# Altium PCB RF_v2.PcbDoc (part 4 of 4)
Units mm, origin at the board's own origin, x right, y up, seen from the top; angles counter-clockwise.
Board outline 203.1 x 72.1 mm, 2 copper layers (Top Layer, Bottom Layer), stack 1.535 mm thick; 384 components, 237 nets, 1087 pads, 1621 vias.
Unrouted connection lines stored in the file: 4.
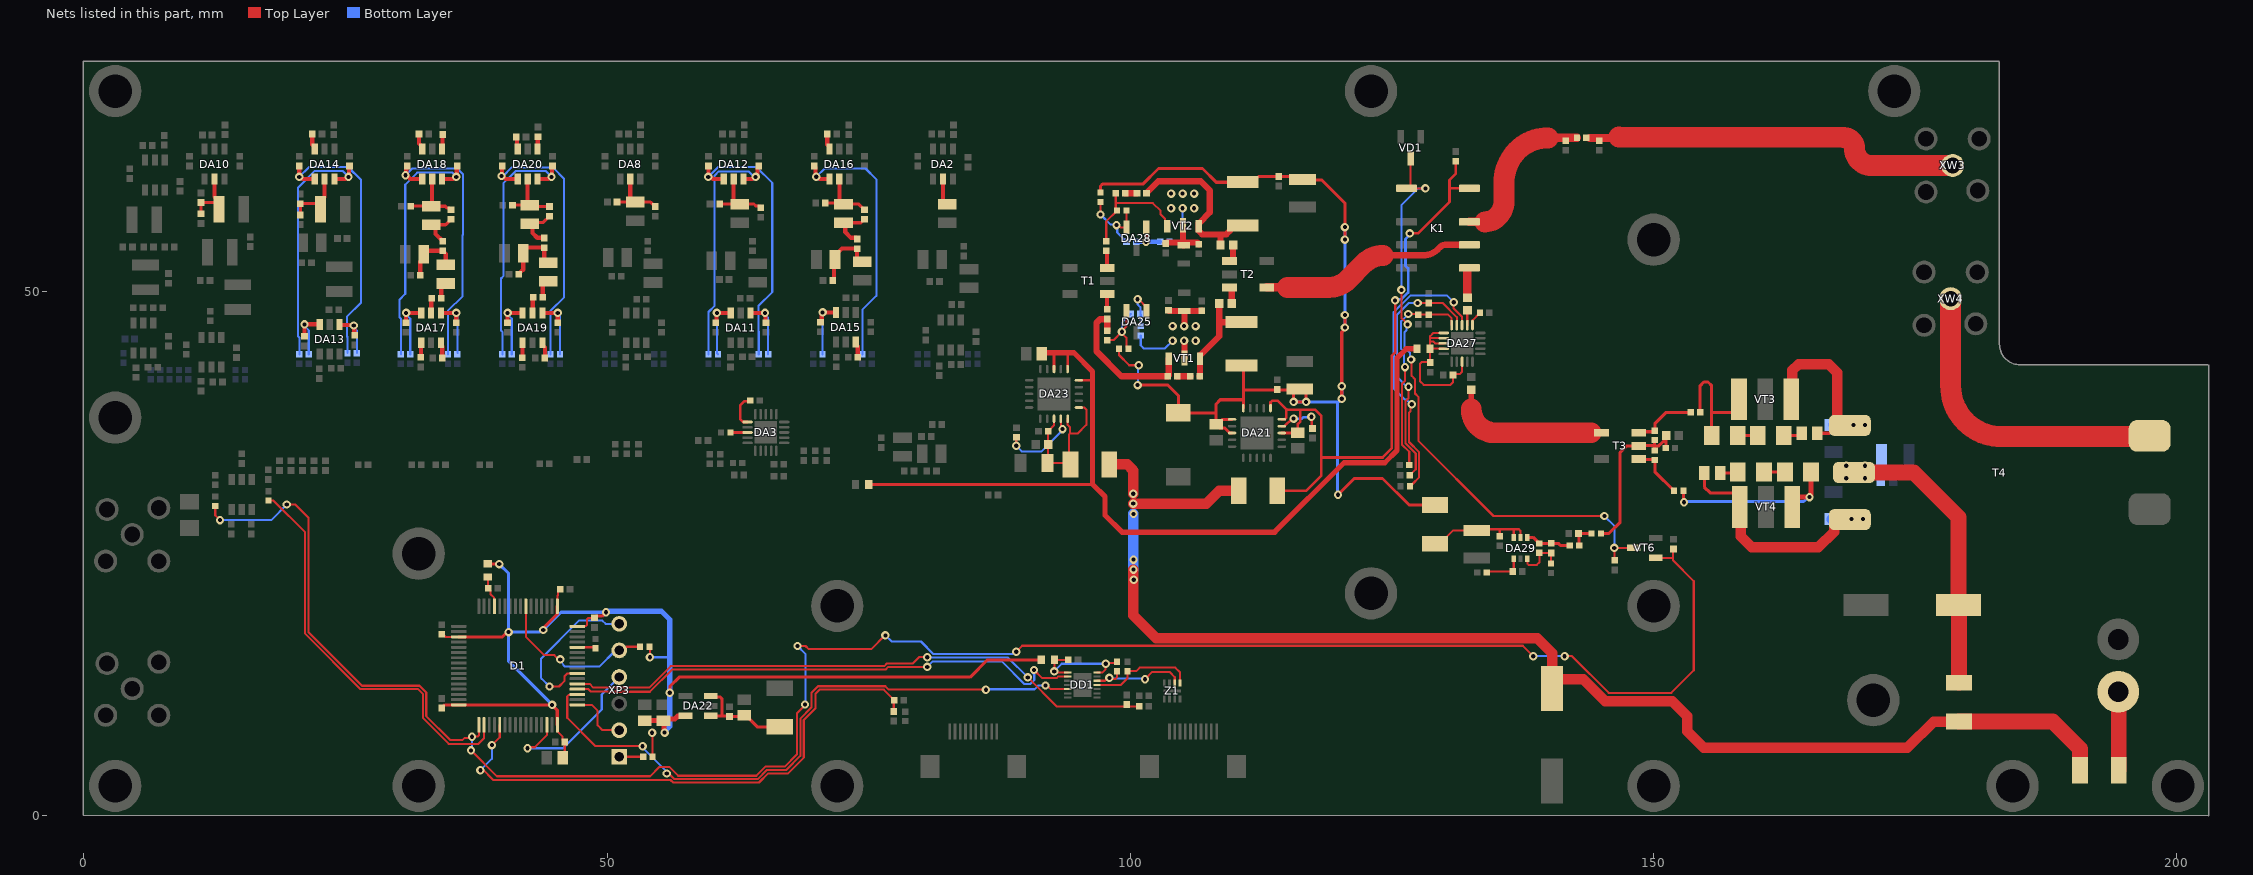
[diagram p3: the nets of this part, all layers, seen from the top]

## Via types
v1: diameter 0.8, hole 0.4, Top Layer to Bottom Layer, tented both sides, 1579 vias
v2: diameter 0.8, hole 0.4, Top Layer to Bottom Layer, 42 vias

## Nets (pads, with @x,y where several pads share a name; then routed paths per layer and width w, separated by ;. In a path a pad name is that pad's centre, name@x,y a point inside that pad or via, vN(x,y) a via of type N, cw(c..) or ccw(c..) an arc to the next point about the centre after c; other vN are vias at no path point) (continued)
NetC81_2: C81.2 DA14.3 | length 1.5
  Top Layer w0.4: C81.2@21.84,65.1 21.84,64.098 22.061,63.877 DA14.3@22.061,63.652
NetC82_1: C82.1 DA11.4 R31.1 | length 6.4
  Top Layer w0.4: DA11.4@63.72,47.999 v1@65.099,47.999 ; v1(65.1,48) 65.15,47.95 65.15,47.11 C82.1@65.2,47.06
  Bottom Layer w0.2: v1(65.1,48) 65.1,47.838 65.4,47.538 R31.1@65.4,44.05
NetC83_1: C83.1 DA11.6 R41.1 | length 6.3
  Top Layer w0.4: C83.1@60.4,47.06 60.45,47.11 60.45,47.95 v1(60.5,48) DA11.6@61.819,47.998
  Bottom Layer w0.2: v1(60.5,48) 60.5,44.15 R41.1@60.6,44.05
NetC84_1: C84.1 DA12.6 R42.2 | length 24
  Top Layer w0.4: DA12.6@63.05,60.802 63.893,60.802 64.092,61 v1(64.2,61) 64.2,61.108 64.38,61.288 64.38,61.92 C84.1@64.5,62.04
  Bottom Layer w0.2: R42.2@59.7,44.05 59.7,48.084 60.289,48.673 60.289,61.133 60.674,61.518 63.522,61.518 64.04,61 v1(64.2,61)
NetC85_1: C85.1 DA12.4 R70.2 | length 26.6
  Top Layer w0.4: v1(59.664,61) 59.682,61.018 59.682,62.022 C85.1@59.7,62.04 ; v1@59.748,61.048 v1@59.796,61 ; v1@59.815,61.019 59.886,61.019 60.103,60.802 DA12.4@61.15,60.802
  Bottom Layer w0.2: v1(59.664,61) 59.697,61 60.636,61.939 64.265,61.939 65.785,60.419 65.785,49.985 64.475,48.675 64.475,46.267 64.5,46.242 R70.2@64.5,44.05
NetC87_1: C87.1 DA13.4 R43.1 | length 5.2
  Top Layer w0.4: DA13.4@24.449,46.915 24.507,46.858 25.742,46.858 v1(25.8,46.8) 25.85,46.75 25.85,45.91 C87.1@25.9,45.86
  Bottom Layer w0.2: v1(25.8,46.8) 25.8,46.638 26.1,46.338 R43.1@26.1,44.15
NetC88_1: C88.1 DA13.6 R72.1 | length 5.6
  Top Layer w0.4: C88.1@21.1,45.76 v1(21.1,46.9) 21.108,46.908 22.541,46.908 DA13.6@22.549,46.915
  Bottom Layer w0.2: v1(21.1,46.9) 21.1,46.738 21.5,46.338 R72.1@21.5,44.05
NetC89_1: C89.1 DA15.3 | length 1.5
  Top Layer w0.4: DA15.3@73.769,45.198 73.769,44.973 73.96,44.782 C89.1@73.96,43.75
NetC90_1: C90.1 C161.2 L20.2 L22.1 | length 6.4
  Top Layer w0.4: C161.2@71.56,51.1 71.675,51.215 71.675,52.985 L22.1@71.79,53.1 71.79,53.48 72.45,54.14 C90.1@73.9,54.14 73.9,53.2 74.21,52.89 L20.2@74.4,52.89
NetC90_2: C90.2 C202.1 L21.1 | length 4.5
  Top Layer w0.3: L21.1@72.6,56.61 74.27,56.61 C202.1@74.6,56.94
  Top Layer w0.4: L21.1@72.6,56.61 72.766,56.444 72.766,55.734 73.326,55.174 73.786,55.174 C90.2@73.9,55.06
NetC91_2: C91.2 C97.2 DA22.1 DA22.3 L30.2 | length 10
  Top Layer w0.3: DA22.1@59.9,9.5 59.93,9.47 60.9,9.47 61.032,9.47 ; DA22.3@59.9,11.4 59.988,11.312 60.798,11.312 60.974,11.136 60.974,9.528 61.032,9.47 ; L30.2@66.5,8.45 64.35,8.45 63.25,9.55 C91.2@63.1,9.55 62.99,9.44 C97.2@61.7,9.44 61.67,9.47 61.032,9.47
NetC98_1: C98.1 C146.1 T4.3 VT3.3 | length 17.8
  Top Layer w0.3: C146.1@165.65,36.5 166.811,36.5 167.561,37.25 T4.3@167.567,37.25
  Top Layer w1: VT3.3@163.155,39.751 163.263,39.859 163.263,42.514 163.849,43.1 166.731,43.1 167.567,42.263 167.567,37.75 T4.3@167.814,37.503
  Bottom Layer w1: C98.1@167.2,37.3 v1(169.1,37.3) v1(170.2,37.3)
NetC100_2: C100.2 DA21.14 | length 4.4
  Top Layer w0.25: DA21.14@114.475,37.175 114.75,37.175 115.475,37.9 v1(115.6,37.9) ; v1(117.3,38.083) 117.35,38.033 117.35,37.01 C100.2@117.4,36.96
  Bottom Layer w0.25: v1(115.6,37.9) 116.4,37.9 116.525,38.025 117.242,38.025 v1(117.3,38.083)
NetC101_2: C101.2 C102.2 C103.2 DA23.13 DA23.15 DA23.16 L39.2 | length 15.5
  Top Layer w0.2: DA23.13@92.71,37.884 92.71,37.259 C103.2@92.154,36.703 92.154,33.704 C101.2@92.105,33.655 94.162,33.655 L39.2@94.289,33.528 94.125,33.692 94.125,36.358 94.242,36.475 ; DA23.15@94.01,37.884 94.01,37.299 94.242,37.067 94.242,36.475 ; DA23.16@95.085,38.959 95.616,38.959 95.8,38.775 95.8,37.3 94.975,36.475 94.242,36.475
NetC105_2: C105.2 DA23.14 | length 7.5
  Top Layer w0.2: v1(89.1,35.3) 89.1,36.09 C105.2@89.125,36.115 ; DA23.14@93.36,37.884 93.36,37.227 93.525,37.062 v1(93.525,36.9)
  Bottom Layer w0.2: v1(89.1,35.3) 89.625,34.775 91.525,34.775 93.525,36.775 v1(93.525,36.9)
NetC112_2: C112.2 D1.13 L40.1 | length 3.1
  Top Layer w0.2: L40.1@38.6,22.77 38.64,22.73 C112.2@38.64,21.7 38.86,21.48 38.86,21.14 39.21,20.79 39.21,20.01 D1.13@39.25,19.97
NetC113_2: C113.2 DD1.1 DD1.14 L41.2 R32.2 | length 11.6
  Top Layer w0.2: DD1.1@94.03,13.65 92.825,13.65 v1(92.725,13.75) 92.755,13.78 L41.2@92.755,14.85 94.063,14.85 C113.2@94.076,14.863 ; DD1.14@96.82,13.65 97.35,13.65 97.618,13.918 97.618,14.443 97.711,14.536 98.585,14.536 R32.2@98.719,14.67
  Bottom Layer w0.2: v1(92.725,13.75) 93.45,14.475 v1(97.65,14.475)
NetC114_2: C114.2 D1.37 R36.2 | length 53.2
  Top Layer w0.2: v1@38.02,4.48 39.131,3.369 56.071,3.369 56.315,3.125 64.528,3.125 65.403,4 67.3,4 68.8,5.5 68.8,9.1 69.926,10.226 69.926,11.626 70.3,12 76.45,12 R36.2@77.45,11 77.4,10.95 C114.2@77.4,9.92 ; v1(39,6.7) 39.75,7.45 D1.37@39.75,8.63
  Bottom Layer w0.2: v1(37.9,4.3) 39,5.4 v1(39,6.7)
NetC115_1: C115.1 DA29.1 R26.2 | length 3.8
  Top Layer w0.2: R26.2@134.05,23.2 134.15,23.3 C115.1@136.54,23.3 136.637,23.397 DA29.1@136.637,24.502
NetC116_1: C116.1 DA14.6 R73.2 | length 24.2
  Top Layer w0.4: DA14.6@23.961,60.802 24.993,60.802 25.192,61 v1(25.3,61) 25.35,61.05 25.35,61.99 C116.1@25.4,62.04
  Bottom Layer w0.2: R73.2@20.6,44.05 20.6,45.642 20.475,45.767 20.475,59.975 22.072,61.572 24.728,61.572 v1(25.3,61)
NetC117_1: C117.1 DA14.4 R74.2 | length 26.5
  Top Layer w0.4: C117.1@20.6,62.04 v1(20.6,61) 20.708,61 20.907,60.802 DA14.4@22.061,60.802
  Bottom Layer w0.2: v1(20.6,61) 21.546,61.946 25.254,61.946 26.5,60.7 26.5,49 25.175,47.675 25.175,45.717 25.2,45.692 R74.2@25.2,44.15
NetC118_2: C118.2 DA16.3 | length 1.5
  Top Layer w0.4: C118.2@71.04,65.1 71.04,64.087 71.25,63.877 DA16.3@71.25,63.652
NetC119_1: C119.1 DA17.1 | length 1.4
  Top Layer w0.4: C119.1@32.2,43.76 32.22,43.78 32.22,45.129 DA17.1@32.239,45.148
NetC121_2: C121.2 DA18.1 | length 1.4
  Top Layer w0.4: DA18.1@34.24,63.652 34.27,63.682 34.27,65.01 C121.2@34.3,65.04
NetC124_1: C124.1 R46.1 | length 1.2
  Top Layer w0.6: R46.1@104.475,41.946 C124.1@105.725,41.946
NetC124_2: C124.2 C127.2 L44.2 VT1.3 | length 9.8
  Top Layer w0.6: C124.2@106.645,41.946 106.668,41.97 106.668,43.953 108.493,45.777 108.493,47.117 ; C127.2@108.493,48.895 108.493,47.117 ; L44.2@110.617,47.117 108.493,47.117
NetC126_1: C126.1 R45.2 R46.2 VT1.1 | length 14.5
  Top Layer w0.6: R45.2@97.79,46.297 C126.1@97.79,47.419 97.77,47.399 97.105,47.399 96.774,47.068 96.774,44.323 99.151,41.946 R46.2@103.575,41.946 103.668,42.039 VT1.1@103.668,43.621
NetC126_2: C126.2 T1.3 | length 1.5
  Top Layer w0.4: C126.2@97.782,48.347 T1.3@97.782,49.804
NetC127_1: C127.1 T2.1 | length 1.7
  Top Layer w0.6: T2.1@109.482,50.439 109.613,50.439 109.693,50.359 C127.1@109.693,48.895
NetC128_2: C128.2 C136.2 DA8.5 L11.2 | length 5.5
  Top Layer w0.3: C136.2@50.96,58.6 L11.2@52.221,58.6 ; L11.2@52.7,58.59 54.17,58.59 C128.2@54.6,58.16
  Top Layer w0.4: L11.2@52.221,58.611 DA8.5@52.221,60.802
NetC129_1: C129.1 C130.1 R47.1 R85.2 VT1.2 | length 10.7
  Top Layer w0.6: C129.1@103.644,48.265 103.726,48.183 R47.1@105.168,48.183 ; VT1.2@105.168,43.696 v2@105.168,45.336 ; v2@105.168,46.736 R47.1@105.168,48.183 ; C130.1@106.819,48.217 106.785,48.183 R47.1@105.168,48.183
  Bottom Layer w0.2: R85.2@101,45.85 101,44.9 101.3,44.6 103.303,44.6 v2(104.039,45.336)
  other v2: 105.14,45.336 106.24,45.336 104.039,46.736 105.14,46.736 106.24,46.736
NetC131_1: C131.1 DA27.2 | length 1.4
  Top Layer w0.2: C131.1@132.199,48.252 C131.1@132.207,48.26
  Top Layer w0.25: DA27.2@132.199,46.835 C131.1@132.199,48.252
NetC131_2: C131.2 K1.5 | length 2.8
  Top Layer w0.8: C131.2@132.207,49.46 K1.5@132.207,52.25
NetC132_1: C132.1 T2.3 | length 1.8
  Top Layer w0.6: T2.3@109.482,52.939 109.74,52.939 109.82,53.019 C132.1@109.82,54.483
NetC132_2: C132.2 C143.2 L47.1 VT2.3 | length 17.1
  Top Layer w0.6: C143.2@101.552,59.448 101.564,59.448 101.572,59.456 101.572,59.468 102.683,60.579 106.721,60.579 107.6,59.7 107.6,57.6 106.585,56.585 106.529,56.585 106.529,55.85 106.88,55.499 108.585,55.499 ; C132.2@108.62,54.483 108.62,55.464 108.585,55.499 ; L47.1@110.744,56.35 109.789,56.35 109.519,56.08 109.519,55.85 109.168,55.499 108.585,55.499
NetC133_2: C133.2 C134.2 R48.2 R86.2 VT2.2 | length 9.5
  Top Layer w0.6: C133.2@103.378,54.641 103.46,54.723 105.029,54.723 106.392,54.723 C134.2@106.553,54.562 ; VT2.2@105.029,56.36 105.029,54.475 R48.2@105.1,54.475
  Bottom Layer w0.2: R86.2@103.75,54.8 104.7,54.8 105,55.1 v2(105,58)
  other v2: 103.9,58 106.1,58 103.9,59.4 105,59.4 106.1,59.4
NetC135_2: C135.2 C145.2 DA10.5 L13.2 | length 5.9
  Top Layer w0.3: C135.2@11.2,57.46 C145.2@11.2,58.54 12.56,58.54 12.92,58.18 L13.2@12.92,57.9
  Top Layer w0.4: DA10.5@12.497,60.802 12.509,60.79 12.509,59.091 12.9,58.7 L13.2@12.9,58.28
NetC137_2: C137.2 C138.2 DA27.6 DA27.7 DA27.8 DA27.9 DA27.13 L45.1 | length 16.7
  Top Layer w0.2: DA27.9@129.949,44.585 128.654,44.585 L45.1@128.646,44.577 ; DA27.8@129.949,45.085 129.14,45.085 128.975,45.25 128.646,45.25 ; DA27.7@129.949,45.585 128.706,45.585 128.646,45.525 ; DA27.6@129.949,46.085 128.96,46.085 128.646,45.771 128.646,45.525 ; DA27.13@131.699,43.335 131.699,42.374 131.475,42.15 130.91,42.15 C137.2@130.835,42.075 130.835,41.36 130.6,41.125 128.025,41.125 127.675,41.475 127.675,43.125 127.875,43.325 128.585,43.325 128.646,43.264 L45.1@128.646,44.577 ; L45.1@128.646,44.577 128.646,45.25 ; 128.646,45.25 128.646,45.525
NetC139_1: C139.1 R56.1 R57.1 VT2.1 | length 11.4
  Top Layer w0.2: C139.1@97.7,54.86 97.7,56.748 R56.1@98.737,57.785 98.61,57.912 98.61,58.488 ; R57.1@98.61,59.436 98.61,58.488 ; VT2.1@103.529,56.285 103.329,56.485 103.329,56.971 102.9,57.4 102.9,57.747 102.158,58.488 98.61,58.488
NetC139_2: C139.2 T1.1 | length 1.7
  Top Layer w0.4: C139.2@97.7,53.94 cw(c97.502,53.742) 97.782,53.742 T1.1@97.782,52.304
NetC140_2: C140.2 DA27.4 R53.1 | length 24.2
  Top Layer w0.2: v1(126.576,40.95) 126.576,39.834 126.276,39.534 126.276,35.566 127.275,34.567 127.275,33.05 R53.1@126.7,32.475 ; v1(127.45,48.95) 128.517,48.95 C140.2@128.524,48.943 129.857,48.943 131.199,47.601 DA27.4@131.199,46.835
  Bottom Layer w0.2: v1(126.576,40.95) 126.425,40.95 125.5,41.875 125.5,47.85 126.6,48.95 v1(127.45,48.95)
NetC141_2: C141.2 DA27.5 R54.1 R55.1 | length 20.3
  Top Layer w0.2: v1(126.251,42.825) 126.251,41.509 125.951,41.209 125.951,35.431 126.65,34.732 R54.1@126.65,33.475 ; v1(126.55,47.9) 127.429,47.9 127.498,47.831 C141.2@128.524,47.831 130.368,47.831 130.699,47.5 DA27.5@130.699,46.835
  Bottom Layer w0.2: v1(126.251,42.825) 126.15,42.926 126.15,44.29 125.875,44.565 125.875,47.208 126.55,47.883 v1(126.55,47.9)
NetC142_1: C142.1 DA29.3 R50.2 R58.1 | length 4.9
  Top Layer w0.2: DA29.3@137.937,24.502 137.937,24.042 138.054,23.925 138.85,23.925 139.1,24.175 139.1,25.042 R58.1@139.065,25.077 140.198,25.077 C142.1@140.208,25.067 140.208,24.058 R50.2@140.2,24.05
NetC142_2: C142.2 DA29.4 R58.2 R60.1 | length 4.4
  Top Layer w0.3: DA29.4@137.937,26.552 138.49,26.552 R58.2@139.065,25.977 140.901,25.977 141.097,25.781 R60.1@141.986,25.781
NetC143_1: C143.1 R57.2 | length 1.1
  Top Layer w0.6: R57.2@99.51,59.436 C143.1@100.632,59.436
NetC144_2: C144.2 C151.1 DA29.5 DA29.6 L46.2 | length 10.9
  Top Layer w0.2: L46.2@129.1,25.95 129.6,25.95 130.875,27.225 C144.2@133.1,27.225 133.2,27.325 135.351,27.325 ; C151.1@135.3,26.66 135.3,27.274 135.351,27.325 ; DA29.6@136.637,26.552 136.637,27.32 136.642,27.325 ; DA29.5@137.287,26.552 137.287,27.163 137.125,27.325 135.351,27.325
NetC146_2: C146.2 R62.2 | length 1.8
  Top Layer w0.3: R62.2@162.45,36.3 C146.2@163.95,36.3 ; C146.2@163.95,36.1 C146.2@164.15,36.3
NetC147_1: C147.1 R60.2 R61.1 | length 2.4
  Top Layer w0.3: R60.2@142.886,25.781 142.886,26.865 C147.1@142.827,26.924 R61.1@144.076,26.924
NetC148_1: C148.1 DA17.3 | length 1.7
  Top Layer w0.4: C148.1@34.139,43.821 C148.1@34.26,43.7 34.26,44.802 34.139,44.923 DA17.3@34.139,45.148
NetC152_1: C152.1 T3.5 | length 14.6
  Top Layer w0.5: 132.575,38.825 C152.1@132.575,40.675
  Top Layer w2: 132.575,38.825 132.576,38.748 ccw(c134.859,38.825) 132.732,37.994 132.789,37.86 ccw(c134.859,38.825) 133.193,37.263 133.296,37.159 ccw(c134.859,38.825) 134.659,36.55 144,36.55
NetC153_2: C153.2 R61.2 R63.1 R87.2 R88.1 T3.2 | length 16
  Top Layer w0.3: R61.2@144.976,26.924 145.724,26.924 146.8,28 146.8,34.671 147.429,35.3 T3.2@148.57,35.3 148.596,35.326 150.1,35.326 ; R88.1@150.1,34.85 150.1,35.326 ; R87.2@150.1,35.85 150.1,35.326 ; R63.1@151.15,35.1 151.175,35.125 151.175,35.7 ; C153.2@151.2,36.3 151.175,36.275 151.175,35.7 ; 150.1,35.326 150.126,35.3 150.5,35.3 150.9,35.7 151.175,35.7
NetC154_2: C154.2 C156.1 C157.2 L49.2 T4.2 | length 27.6
  Top Layer w1: C156.1@179.125,20.075 C156.1@179.175,20.025
  Top Layer w1.5: T4.2@169.15,32.75 174.85,32.75 179.125,28.475 C156.1@179.125,20.075 ; L49.2@179.175,12.65 C156.1@179.175,20.025
  other v1: 168.4,32.2 170.2,32.2 168.4,33.4 170.2,33.4
NetC155_1: C155.1 C210.1 T4.1 VT4.3 | length 24.3
  Top Layer w0.3: C155.1@154.85,32.9 C155.1@154.85,32.7 154.85,31.35 155.4,30.8 157.642,30.8 158.242,30.2 VT4.3@158.242,29.464
  Top Layer w1: VT4.3@158.242,29.464 158.31,29.396 158.31,26.66 159.37,25.6 165.754,25.6 167.25,27.096 167.25,27.75 167.75,28.25 T4.1@168.75,28.25
  Bottom Layer w1: C210.1@167,28.3 C210.1@167.2,28.3 v1(168.9,28.3) v1(170,28.3)
NetC155_2: C155.2 R66.2 | length 1.7
  Top Layer w0.3: C155.2@156.35,32.7 R66.2@157.95,32.7 ; R66.2@157.95,32.9 R66.2@158.05,33
NetC158_2: C158.2 D1.53 R68.2 | length 57.2
  Top Layer w0.2: D1.53@47.17,12.55 48.35,12.55 48.7,12.2 54.04,12.2 56.09,14.25 66.268,14.25 76.488,14.25 76.738,14.5 79.2,14.5 79.825,15.125 80.575,15.125 v1(80.6,15.1) ; v1(90.198,13.173) 90.202,13.173 93,10.375 99.453,10.375 C158.2@99.656,10.578 99.831,10.403 R68.2@100.857,10.403
  Bottom Layer w0.2: v1(80.6,15.1) 80.625,15.075 88.296,15.075 v1(90.198,13.173)
NetC159_1: C159.1 DA17.5 | length 1.4
  Top Layer w0.4: DA17.5@33.189,47.998 33.215,48.024 33.215,49.375 C159.1@33.24,49.4
NetC159_2: C159.2 L24.1 | length 1.7
  Top Layer w0.4: C159.2@34.16,49.4 34.16,50.5 34.47,50.81 L24.1@34.6,50.81
NetC160_1: C160.1 C165.2 L24.2 L26.1 | length 5.6
  Top Layer w0.4: C165.2@32.16,51.6 32.16,52.89 32.49,53.22 L26.1@32.49,53.6 32.49,53.63 32.8,53.94 C160.1@34.3,53.94 34.6,53.64 L24.2@34.6,52.59
NetC160_2: C160.2 C203.1 L25.1 | length 4.1
  Top Layer w0.3: L25.1@33.28,56.42 34.58,56.42 C203.1@35.1,56.94
  Top Layer w0.4: L25.1@33.2,56.41 33.316,56.41 33.626,56.1 33.626,55.534 C160.2@34.3,54.86
NetC162_2: C162.2 DA18.3 | length 1.6
  Top Layer w0.4: C162.2@32.04,65.1 32.04,64.177 32.34,63.877 DA18.3@32.34,63.652
NetC163_1: C163.1 DA15.6 R75.1 | length 6.3
  Top Layer w0.4: C163.1@70.4,47.11 70.52,47.23 70.52,47.862 70.6,47.942 v1(70.6,48.05) ; v1@70.601,48.049 DA15.6@71.869,48.048
  Bottom Layer w0.2: R75.1@70.6,44.05 v1(70.6,48.05)
NetC164_1: C164.1 DA16.4 R77.2 | length 26.2
  Top Layer w0.4: C164.1@69.8,62.04 69.92,61.92 69.92,61.188 69.998,61.11 v1(69.998,61.002) ; v1@70,61.002 70.106,61.002 70.307,60.802 DA16.4@71.25,60.802
  Bottom Layer w0.2: v1(69.998,61.002) 70.002,61.002 70.801,61.801 74.699,61.801 75.734,60.766 75.734,49.634 74.4,48.3 R77.2@74.4,44.05
NetC166_1: C166.1 DA17.4 R76.1 | length 6.3
  Top Layer w0.4: DA17.4@34.139,47.998 35.599,47.999 C166.1@35.6,47.06
  Bottom Layer w0.2: v1(35.6,48) 35.6,47.838 35.721,47.716 35.721,44.171 R76.1@35.7,44.15
NetC167_1: C167.1 DA17.6 R78.1 | length 6.5
  Top Layer w0.4: C167.1@30.8,47.06 v1(30.8,48) ; v1@30.801,47.999 DA17.6@32.238,47.999
  Bottom Layer w0.2: v1(30.8,48) 30.8,47.838 31.2,47.438 R78.1@31.2,44.05
NetC168_1: C168.1 DA18.6 R79.2 | length 24.5
  Top Layer w0.4: DA18.6@34.24,60.802 35.293,60.802 35.492,61 v1(35.6,61) 35.65,61.05 35.65,61.99 C168.1@35.7,62.04
  Bottom Layer w0.2: R79.2@30.3,44.05 30.3,47.458 30.175,47.583 30.175,49.267 30.723,49.815 30.723,51.339 30.725,51.341 30.725,60.248 31.78,61.303 31.897,61.42 35.196,61.42 35.6,61.016 v1(35.6,61)
NetC169_1: C169.1 DA18.4 R80.2 | length 26.5
  Top Layer w0.4: v1(30.746,61.154) v1@30.9,61.154 ; C169.1@30.9,62.04 30.823,61.963 30.823,61.231 v1@30.9,61.154 ; DA18.4@32.34,60.802 31.207,60.802 30.9,61.108 v1@30.9,61.154
  Bottom Layer w0.2: v1(30.746,61.154) 31.393,61.8 35.7,61.8 36.225,61.275 36.225,55.442 36.2,55.417 36.2,49.6 34.8,48.2 R80.2@34.8,44.05
NetC170_1: C170.1 DA19.1 | length 1.4
  Top Layer w0.4: C170.1@41.9,43.72 41.917,43.737 41.917,45.131 DA19.1@41.934,45.148
NetC171_2: C171.2 DA20.1 | length 1.2
  Top Layer w0.4: DA20.1@43.365,63.652 43.383,63.669 43.383,64.822 C171.2@43.4,64.84
NetC172_1: C172.1 DA19.3 | length 1.5
  Top Layer w0.4: DA19.3@43.834,45.148 43.834,44.923 44.06,44.698 C172.1@44.06,43.7
NetC173_1: C173.1 DA19.5 | length 1.5
  Top Layer w0.4: DA19.5@42.884,47.998 42.912,48.027 42.912,49.472 C173.1@42.94,49.5
NetC173_2: C173.2 L27.1 | length 1.9
  Top Layer w0.4: C173.2@43.86,49.5 43.86,50.7 44.17,51.01 L27.1@44.4,51.01
NetC174_1: C174.1 C176.2 L27.2 L29.1 | length 6.2
  Top Layer w0.4: C176.2@41.56,51.7 41.99,52.13 41.99,53.88 42.35,54.24 C174.1@44,54.24 44,53.1 44.31,52.79 L27.2@44.4,52.79
NetC174_2: C174.2 C206.1 L28.1 | length 5.4
  Top Layer w0.3: L28.1@42.155,56.355 42.446,56.646 43.906,56.646 C206.1@44.5,57.24
  Top Layer w0.4: L28.1@42.155,56.355 42.721,56.355 42.876,56.2 42.876,55.634 43.331,55.179 43.981,55.179 C174.2@44,55.16
NetC175_2: C175.2 DA20.3 | length 1.2
  Top Layer w0.4: C175.2@41.34,64.8 41.403,64.737 41.403,63.714 DA20.3@41.465,63.652
NetC177_1: C177.1 DA19.4 R81.1 | length 6.4
  Top Layer w0.4: DA19.4@43.835,47.999 45.299,47.999 C177.1@45.3,47.06
  Bottom Layer w0.2: v1(45.3,48) 45.3,47.838 45.5,47.638 R81.1@45.5,44.05
NetC178_1: C178.1 DA19.6 R82.1 | length 6.5
  Top Layer w0.4: C178.1@40.5,47.06 v1(40.5,48) DA19.6@41.934,47.998
  Bottom Layer w0.2: v1(40.5,48) 40.5,47.838 40.9,47.438 R82.1@40.9,44.05
NetC179_1: C179.1 DA20.6 R83.2 | length 24.3
  Top Layer w0.4: DA20.6@43.365,60.802 44.393,60.802 44.592,61 v1(44.7,61) 44.75,61.05 44.75,61.99 C179.1@44.8,62.04
  Bottom Layer w0.2: R83.2@40,44.05 40,46.192 39.875,46.317 39.875,51.291 40.103,51.519 40.103,60.378 41.3,61.575 44.125,61.575 v1(44.7,61)
NetC180_1: C180.1 DA20.4 R84.2 | length 26.7
  Top Layer w0.4: v1(39.921,61.079) v1@40,61.079 ; C180.1@40,62.04 39.96,62 39.96,61.119 v1@40,61.079 ; DA20.4@41.465,60.802 40.307,60.802 40.029,61.079 v1@40,61.079
  Bottom Layer w0.2: v1(39.921,61.079) 40.079,61.079 40.9,61.9 44.8,61.9 45.9,60.8 45.9,49.5 44.6,48.2 R84.2@44.6,44.05
NetC181_2: C181.2 C199.2 DA12.5 L19.2 | length 6
  Top Layer w0.3: C199.2@60.76,58.4 L19.2@62.3,58.4 ; L19.2@62.69,58.4 64.04,58.4 64.21,58.23 64.53,58.23 C181.2@64.7,58.06
  Top Layer w0.4: DA12.5@62.1,60.802 62.1,58.79 L19.2@62.3,58.59
NetC182_1: C182.1 DA25.2 R44.1 R45.1 | length 7.9
  Top Layer w0.2: R45.1@97.79,45.397 98.397,45.397 v1(99.2,46.2) ; DA25.2@99.647,48.203 99.647,46.743 99.2,46.297 v1(99.2,46.2) ; R44.1@99.822,44.577 99.622,44.777 99.622,45.632 99.2,46.054 v1(99.2,46.2)
  Bottom Layer w0.2: v1(99.2,46.2) 99.2,47.06 C182.1@100.04,47.9
NetC182_2: C182.2 DA25.1 R85.1 | length 4.2
  Top Layer w0.2: v1(100.7,49.3) 100.8,49.3 101.546,48.553 DA25.1@101.546,48.203
  Bottom Layer w0.2: v1(100.7,49.3) 100.7,48.8 100.96,48.54 C182.2@100.96,47.9 101,47.86 R85.1@101,46.75
NetC183_1: C183.1 DA28.1 R86.1 | length 3.7
  Top Layer w0.4: v1(101.5,54.8) ccw(c101.418,54.882) 101.534,54.882 DA28.1@101.534,56.168
  Bottom Layer w0.4: C183.1@100.56,54.8 v1(101.5,54.8) R86.1@102.85,54.8
NetC183_2: C183.2 DA28.2 R56.2 R59.2 | length 7.8
  Top Layer w0.2: v1(97.155,57.404) R59.2@97.155,58.605 ; v1(98.679,56.388) 98.841,56.388 99.061,56.168 DA28.2@99.634,56.168 99.634,57.782 R56.2@99.637,57.785
  Bottom Layer w0.2: v1(97.155,57.404) 98.13,56.429 98.638,56.429 v1(98.679,56.388) 98.752,56.315 98.752,55.688 C183.2@99.64,54.8
NetC200_2: C200.2 C201.2 DA14.5 L16.2 | length 6.4
  Top Layer w0.3: C200.2@20.7,57.36 C201.2@20.7,58.44 22.26,58.44 22.62,58.08 L16.2@22.62,57.9
  Top Layer w0.4: L16.2@22.62,57.9 22.62,58.66 23.011,59.051 DA14.5@23.011,60.802
NetC202_2: C202.2 C204.2 DA16.5 L21.2 | length 5.8
  Top Layer w0.3: C204.2@70.86,58.5 L21.2@72.2,58.5 ; L21.2@72.6,58.39 74.07,58.39 C202.2@74.6,57.86
  Top Layer w0.4: DA16.5@72.2,60.802 72.2,58.69 L21.2@72.3,58.59
NetC203_2: C203.2 C205.2 DA18.5 L25.2 | length 6.3
  Top Layer w0.3: C205.2@31.26,58.2 L25.2@32.98,58.2 ; L25.2@33.2,58.19 34.54,58.19 34.7,58.03 34.93,58.03 C203.2@35.1,57.86
  Top Layer w0.4: L25.2@33.135,58.355 33.29,58.51 DA18.5@33.29,60.802
NetC206_2: C206.2 C207.2 DA20.5 L28.2 | length 5.9
  Top Layer w0.3: C207.2@40.96,58.3 L28.2@42.2,58.3 ; L28.2@42.6,58.29 42.73,58.16 C206.2@44.5,58.16
  Top Layer w0.4: L28.2@42.105,58.29 42.415,58.6 DA20.5@42.415,60.802 ; L28.2@42.2,58.29 L28.2@42.305,58.29
NetD1_7: D1.7 R35.1 XP3.5 | length 16
  Top Layer w0.2: D1.7@42.25,19.97 42.25,17.05 44.003,15.297 44.963,15.297 45.367,14.893 v1(45.53,14.893) ; XP3.5@51.167,15.748 51.519,15.748 51.871,16.1 R35.1@53.15,16.1 R35.1@53.202,16.152
  Bottom Layer w0.2: v1(45.53,14.893) 45.866,14.317 45.983,14.2 49.267,14.2 50.815,15.748 XP3.5@51.167,15.748
NetD1_60: D1.60 R38.1 | length 1.8
  Top Layer w0.2: D1.60@47.17,16.05 48.8,16.05 R38.1@48.9,15.95
NetDA2_5: DA2.5 L2.2 | length 3
  Top Layer w0.4: DA2.5@82.1,60.802 82.1,58.5 82.41,58.19 L2.2@82.7,58.19
NetDA3_1: DA3.1 R3.2 | length 3.3
  Top Layer w0.25: DA3.1@63.427,37.576 62.999,37.576 62.725,37.85 62.725,39.15 63.15,39.575 63.634,39.575 R3.2@63.683,39.624
NetDA3_3: DA3.3 R4.1 | length 1.6
  Top Layer w0.25: R4.1@61.789,36.576 DA3.3@63.427,36.576
NetDA27_1: DA27.1 R49.2 | length 1.5
  Top Layer w0.2: DA27.1@132.699,46.835 132.709,46.845 132.709,47.307 R49.2@133.408,48.006
NetDA27_3: DA27.3 R52.1 | length 27.5
  Top Layer w0.2: R52.1@126.725,31.45 126.925,31.65 126.968,31.65 127.6,32.282 127.6,34.701 126.634,35.667 126.634,38.475 126.786,38.627 126.786,39.16 v1(126.901,39.275) ; v1(130.9,49.025) 130.9,48.424 131.699,47.625 DA27.3@131.699,46.835
  Bottom Layer w0.2: v1(126.901,39.275) 126.816,39.275 126.364,39.728 126.222,39.728 125.175,40.775 125.175,48.075 125.962,48.862 125.977,48.862 126.764,49.65 130.275,49.65 v1(130.9,49.025)
NetK1_6: K1.6 T2.5 | length 20.7
  Top Layer w0.6: 124.152,53.5 128,53.5 ccw(c128,55.431) 129.366,54.066 129.6,54.3 cw(c130.083,53.817) 130.083,54.5 K1.6@132.4,54.5
  Top Layer w0.8: T2.5@113.022,50.439 115,50.439
  Top Layer w2: 115,50.439 118.987,50.439 ccw(c118.987,52.979) 120.783,51.183 122.356,52.756 cw(c124.152,50.96) 124.152,53.5
NetK1_7: K1.7 R39.1 R40.1 | length 15.7
  Top Layer w0.8: K1.7@132.4,56.7 133.893,56.7 ; 135.7,60.404 135.7,60.406 ; 139.896,64.732 141.6,64.732 R39.1@142.679,64.732
  Top Layer w2: 133.893,56.7 ccw(c133.893,58.407) 135.1,57.2 ccw(c133.651,58.649) 135.7,58.649 135.7,60.404 ; 135.7,60.406 cw(c140.117,60.416) 136.995,63.541 ; 136.996,63.541 cw(c139.871,60.665) 139.896,64.732
NetL50_1: L50.1 XP1.1 | length 7.5
  Top Layer w1.5: L50.1@194.45,4.3 XP1.1@194.45,11.75
NetR34_2: R34.2 XP3.1 | length 2.3
  Top Layer w0.2: XP3.1@51.167,5.588 53.438,5.588 R34.2@53.45,5.6
NetR39_2: R39.2 R71.1 XW3.1 | length 35.6
  Top Layer w0.8: 143.9,64.71 146.3,64.71
  Top Layer w2: 146.7,64.799 168.185,64.745 cw(c168.185,63.729) 169.201,63.729 ccw(c170.865,63.729) 170.865,62.065 ; 170.875,62.09 XW3.1@178.387,62.09
NetR51_1: R51.1 R87.1 T3.1 | length 6.1
  Top Layer w0.3: T3.1@148.57,36.55 148.67,36.65 150,36.65 R87.1@150.1,36.75 150.125,36.775 150.125,37.425 151.2,38.5 R51.1@153.45,38.5
NetR51_2: R51.2 R64.1 VT3.1 | length 12.4
  Top Layer w0.3: R51.2@154.45,38.5 154.45,41.05 154.8,41.4 155.2,41.4 155.55,41.05 155.55,38.5 ; R64.1@155.55,36.1 R64.1@155.55,36.3 155.55,38.5 ; VT3.1@158.155,39.751 158.155,39.1 157.555,38.5 155.55,38.5
NetR62_1: R62.1 R64.2 | length 1.9
  Top Layer w0.3: R64.2@158.05,36.3 R62.1@159.95,36.3
NetR65_1: R65.1 R66.1 | length 2
  Top Layer w0.3: R66.1@160.55,32.8 R65.1@162.55,32.8
NetR65_2: R65.2 R89.2 VT4.1 | length 18.3
  Top Layer w0.3: R89.2@152.85,31 152.875,30.975 152.875,29.925 v1(152.9,29.9)
  Top Layer w0.5: VT4.1@163.242,29.464 163.242,29.9 163.742,30.4 v1(164.9,30.4) 164.9,30.481 165.05,30.631 R65.2@165.05,33
  Bottom Layer w0.3: v1(152.9,29.9) 152.975,29.975 164.34,29.975 164.765,30.4 v1(164.9,30.4)
NetR88_2: R88.2 R89.1 T3.3 | length 5.3
  Top Layer w0.3: T3.3@148.57,34.05 148.62,34 150.05,34 R88.2@150.1,33.95 150.125,33.925 150.125,32.825 R89.1@151.95,31
NetT4_4: T4.4 XW4.1 | length 30
  Top Layer w2: XW4.1@178.387,49.358 178.387,41.02 ccw(c183.232,41.02) 183.232,36.175 T4.4@197.319,36.175
RELAY_TX: C125.1 K1.1 VD1.3 VT6.3 | length 58.3
  Top Layer w0.2: v1(125.9,50.2) 125.9,49.484 125.925,49.459 125.925,48.467 125.925,47.475 v1(126.5,46.9) ; K1.1@126.4,59.9 126.519,59.9 126.769,60.15 126.769,62.719 VD1.3@126.8,62.75 ; K1.1@126.677,59.9 v1(128.2,59.9) ; v1(126.835,43.543) 126.876,43.501 126.876,41.981 127.201,41.656 127.201,40.299 127.526,39.974 127.526,35.774 134.7,28.6 v1(145.3,28.6) ; C125.1@146.3,24.36 146.25,24.41 v1(146.25,25.55) VT6.3@148.1,25.55
  Bottom Layer w0.2: v1(125.9,50.2) 125.9,58.3 127.5,59.9 v1(128.2,59.9) ; v1(126.5,46.9) 126.385,46.785 126.385,46.344 126.2,46.159 126.2,44.7 126.72,44.18 126.72,43.658 v1(126.835,43.543) ; v1(145.3,28.6) 146.25,27.65 v1(146.25,25.55)
RF_3V3: C104.2 DA23.1 DA23.3 DA23.20 L5.2 L45.2 | length 88.6
  Top Layer w0.25: DA23.3@92.71,42.634 92.71,44.196 ; DA23.1@94.01,42.634 94.01,44.196 ; DA23.20@95.085,41.559 96.4,41.559
  Top Layer w0.3: L5.2@74.998,31.6 96.365,31.6 96.4,31.635
  Top Layer w0.5: C104.2@91.55,44.1 91.646,44.196 92.71,44.196 94.01,44.196 94.604,44.196 96.4,42.4 96.4,41.559 96.4,31.635 97.571,30.464 97.571,28.673 99.194,27.05 113.791,27.05 120.425,33.683 124.317,33.683 125.476,34.843 125.476,43.676 126.377,44.577 L45.2@127.386,44.577
RS422_RX: D1.52 DD1.2 | length 50.8
  Top Layer w0.2: D1.52@47.17,12.05 48.235,12.05 48.474,11.811 50.111,11.811 50.1,11.8 54.1,11.8 56.225,13.925 66.134,13.925 76.623,13.925 76.873,14.175 v1(80.6,14.175) ; v1(90.8,13.875) 91.55,13.125 92.984,13.125 93.109,13.25 DD1.2@94.03,13.25
  Bottom Layer w0.2: v1(80.6,14.175) 81.125,14.7 87.7,14.7 89.852,12.548 90.457,12.548 90.823,12.914 90.823,13.432 90.59,13.665 v1(90.8,13.875)
RS422_TX: D1.51 DD1.5 | length 60.6
  Top Layer w0.2: D1.51@47.17,11.55 47.13,11.51 46.346,11.51 46.2,11.364 46.2,9.3 48.9,6.6 v1(53.4,6.6) ; v1(55.705,3.994) 55.868,3.994 56.062,3.799 56.101,3.799 56.45,3.45 64.393,3.45 65.268,4.325 67.117,4.325 68.475,5.683 68.475,9.235 69.543,10.303 69.543,11.703 70.165,12.325 76.585,12.325 76.91,12 v1(86.2,12) ; v1(91.9,12.4) 92.062,12.4 92.412,12.05 DD1.5@94.03,12.05
  Bottom Layer w0.2: v1(53.4,6.6) 53.4,6.45 55.705,4.144 v1(55.705,3.994) ; v1(86.2,12) 86.237,12.037 90.856,12.037 91.2,12.381 91.881,12.381 v1(91.9,12.4)
RS422A: DD1.12 R32.1 Z1.6 | length 10.1
  Top Layer w0.2: DD1.12@96.82,12.85 97.583,12.85 97.858,13.125 v1(98,13.125) 98.092,13.033 98.583,13.033 98.719,13.169 R32.1@98.719,13.77 ; v1(101.4,13) 102.1,13.7 103.75,13.7 104.25,13.2 Z1.6@104.25,12.64
  Bottom Layer w0.2: v1(98,13.125) 98.062,13.063 101.337,13.063 v1(101.4,13)
RS422B: DD1.11 R33.2 Z1.5 | length 10.2
  Top Layer w0.2: DD1.11@96.82,12.45 99.1,12.45 99.735,13.085 R33.2@99.735,13.77 100.57,13.77 100.9,14.1 104.3,14.1 104.75,13.65 Z1.5@104.75,12.64
RX_EN: D1.34 R8.2 | length 38.8
  Top Layer w0.2: R8.2@17.645,30.065 18.135,30.065 21.15,27.05 21.15,17.35 26.45,12.05 31.95,12.05 32.4,11.6 32.4,9.3 34.875,6.825 37.725,6.825 38.25,7.35 D1.34@38.25,8.63
SWCLK: D1.49 XP3.2 | length 5.8
  Top Layer w0.2: D1.49@47.17,10.55 48.55,10.55 49.1,10 49.1,8.6 49.572,8.128 XP3.2@51.167,8.128
SWDIO: D1.46 XP3.4 | length 15.8
  Top Layer w0.2: v1(42.4,6.4) 42.5,6.5 43.1,6.5 44.25,7.65 D1.46@44.25,8.63
  Bottom Layer w0.2: v1(42.4,6.4) 45.8,6.4 49.5,10.1 49.5,11.541 XP3.4@51.167,13.208
SWO: D1.55 XP3.6 | length 15.6
  Top Layer w0.2: v1(44.5,12.3) 45.409,12.3 45.925,12.816 45.925,13.258 46.217,13.55 D1.55@47.17,13.55
  Bottom Layer w0.2: v1(44.5,12.3) 43.759,13.041 43.7,13.1 43.7,14.984 47.316,18.6 49.55,18.6 49.862,18.288 XP3.6@51.167,18.288
TX_EN: C209.1 D1.33 R9.2 VT6.1 | length 195.4
  Top Layer w0.2: R9.2@12.565,29.557 12.565,28.66 v1(13.025,28.2) ; v1(19.392,29.692) 20.208,29.692 21.475,28.425 21.475,17.485 26.585,12.375 32.085,12.375 32.725,11.735 32.725,9.475 34.993,7.207 36.207,7.207 36.4,7.4 37,7.4 v1(37.1,7.5) 37.125,7.525 37.633,7.525 37.75,7.642 D1.33@37.75,8.63 ; v1(37,6.2) 39.475,3.725 54.125,3.725 55.019,4.619 55.964,4.619 56.808,3.775 64.259,3.775 65.134,4.65 66.983,4.65 68.15,5.817 68.15,9.742 68.918,10.51 v1(68.918,10.582) ; v1(68.2,16.175) 68.965,16.175 69.265,15.875 75.235,15.875 v1@76.58,17.22 ; v1(89.1,15.625) 89.675,16.2 137.5,16.2 v1(138.5,15.2) ; v1(141.5,15.2) 142.2,15.2 145.7,11.7 151.691,11.7 153.841,13.85 153.841,22.359 151.862,24.338 151.862,24.6 ; VT6.1@150.2,24.6 151.862,24.6 ; C209.1@151.9,25.44 ccw(c151.993,25.347) 151.862,25.347 151.862,24.6
  Bottom Layer w0.2: v1(13.025,28.2) 17.9,28.2 v1(19.392,29.692) ; v1(37,6.2) 37.1,6.3 v1(37.1,7.5) ; v1(68.2,16.175) 68.954,15.421 68.954,10.618 v1(68.918,10.582) ; v1(76.601,17.188) 77.189,16.6 80,16.6 81.2,15.4 88.713,15.4 88.938,15.625 v1(89.1,15.625) ; v1(138.5,15.2) v1(141.5,15.2)
VDD_3V3: C95.2 C96.2 C106.2 C107.2 C108.2 C109.2 C110.2 C111.2 D1.1 D1.19 D1.32 D1.48 D1.64 DA22.5 L40.2 L41.1 R34.1 R35.2 | length 122.8
  Top Layer w0.2: C111.2@34.275,17.365 34.59,17.05 D1.19@35.83,17.05 ; D1.48@45.25,8.63 45.29,8.59 45.29,7.985 45.74,7.535 45.74,7.22 C107.2@45.96,7 45.96,5.71 C106.2@45.75,5.5 ; D1.1@45.25,19.97 45.25,20.95 45.32,21.02 45.32,21.38 C108.2@45.54,21.6 ; D1.64@47.17,18.05 47.21,18.09 47.983,18.09 48.1,18.207 48.1,18.743 48.217,18.86 C109.2@48.8,18.86 ; v1(54.1,15.1) 54.1,15.75 54.15,15.8 ; v1(54.306,7.879) 54.35,7.835 R34.1@54.35,5.6
  Top Layer w0.3: C110.2@34.2,10.24 34.51,10.55 D1.32@35.83,10.55 v1(44.75,10.55) 45.25,10.05 D1.48@45.25,8.63 ; D1.19@35.83,17.05 40.015,17.05 40.465,17.5 v1(40.6,17.5) ; L40.2@38.6,24.03 38.615,24.015 39.685,24.015 v1(39.7,24) ; v1(43.9,17.7) 43.9,17.887 45.24,19.227 45.24,19.96 D1.1@45.25,19.97 ; C109.2@48.8,18.86 48.97,19.03 49.53,19.03 v1(49.9,19.4) ; v1(56,11.7) 56.001,11.701 56.001,12.301 56.9,13.2 84.7,13.2 86.35,14.85 L41.1@91.495,14.85
  Top Layer w0.5: C95.2@53.6,9.05 C96.2@55.4,9.05 ; v1(55.5,7.9) 55.45,7.95 55.45,9 C96.2@55.4,9.05 ; DA22.5@57.5,9.5 57.45,9.45 56.728,9.45 56.469,9.191 55.541,9.191 C96.2@55.4,9.05
  Bottom Layer w0.2: v1(54.1,15.1) 55.799,15.1 56,14.899
  Bottom Layer w0.3: v1(39.7,24) 40.6,23.1 v1(40.6,17.5) ; v1(44.75,10.55) 40.6,14.7 v1(40.6,17.5) ; v1(49.9,19.4) 45.6,19.4 v1(43.9,17.7) 43.765,17.7 43.565,17.5 v1(40.6,17.5)
  Bottom Layer w0.5: v1(49.9,19.4) 49.957,19.457 50.17,19.457 50.212,19.5 55.2,19.5 56,18.7 56,14.899 v1(56,11.7) 56,8.481 55.5,7.981 v1(55.5,7.9)
VDD_12V: C92.1 L39.1 L42.1 L49.1 L50.2 | length 129.7
  Top Layer w1: L39.1@97.989,33.528 99.714,33.528 100.3,32.942 v1@100.3,30.725 ; v1(100.275,29.775) 107.275,29.775 108.5,31 L42.1@110.35,31 ; v1(100.3,23.475) 100.3,22.5 100.3,19.1 102.475,16.925 138.875,16.925 140.3,15.5 C92.1@140.3,12.125 ; C92.1@140.3,11.059 C92.1@140.3,12.125 ; L49.1@179.175,8.95 176.75,8.95 174.23,6.43 154.8,6.43 153.223,8.007 153.223,9.454 151.777,10.9 145.4,10.9 143.291,13.009 140.85,13.009 140.3,12.459 C92.1@140.3,12.125
  Top Layer w1.5: L49.1@179.175,8.95 188.15,8.95 190.75,6.35 L50.2@190.75,4.3
  Bottom Layer w1: v1(100.3,23.475) v1(100.3,24.425) v1(100.3,28.8)
  other v1: 100.325,22.5 100.275,30.725
VDD_12VRF: C93.2 C208.1 DA21.13 DA21.15 DA21.16 K1.8 L42.2 | length 61.4
  Top Layer w0.25: DA21.16@113.4,38.9 113.4,39.454 113.546,39.6 114.1,39.6 114.933,38.767 114.9,38.733 ; L42.2@114.05,31 116.8,31 118.26,32.46 118.26,34.183 ; DA21.13@114.475,36.525 115.975,36.525 C93.2@116,36.55 ; DA21.15@114.475,37.825 114.75,37.825 114.9,37.975 114.9,38.733 ; C93.2@116,36.85 116,37.381 116.25,37.631 116.25,38.733 ; v1(125.3,49.2) 125.3,44.207 124.976,43.883 124.976,35.05 124.11,34.183 118.26,34.183 ; v1(126.7,55.6) 127.5,55.6 130.5,58.6 130.5,59.9 ; C208.1@131.1,62.5 131.1,61.3 130.5,60.7 130.5,59.9 ; K1.8@132.4,59.9 130.5,59.9 ; 114.9,38.733 116.25,38.733 ; 116.25,38.733 117.686,38.733 118.26,38.16 118.26,34.183
  Bottom Layer w0.25: v1(125.3,49.2) 125.405,49.305 125.924,49.305 126.55,49.931 126.55,52.24 126.3,52.49 126.3,55.051 126.7,55.451 v1(126.7,55.6)
VDD_RFIN: C94.2 C99.1 C122.2 C123.1 C149.2 C150.1 DA21.1 DA21.3 DA21.20 L44.1 L46.1 L47.2 R44.2 R59.1 | length 109.9
  Top Layer w0.2: R44.2@98.922,44.577 98.922,43.977 99.899,43 v1(100.8,43)
  Top Layer w0.3: R59.1@97.155,59.505 97.155,60.124 97.331,60.3 101.2,60.3 102.7,61.8 106.9,61.8 108.21,60.49 111.699,60.49 112.248,61.039 C150.1@114.173,61.039 116.181,61.039 116.52,60.7 118.3,60.7 120.5,58.5 v1(120.5,55) ; v1(100.7,41.1) 103.6,41.1 104.6,40.1 C99.1@104.6,38.45 108.12,38.45 108.2,38.53 ; C94.2@108.35,37.35 108.825,37.825 DA21.1@109.725,37.825 ; DA21.3@109.725,36.525 109.5,36.525 109.025,37 108.55,37 C94.2@108.2,37.35 108.2,38.53 ; L44.1@110.617,42.977 110.8,42.794 110.8,40.651 ; DA21.20@110.8,38.9 110.8,39.795 ; C122.2@116.181,40.688 116.144,40.651 C122.2@115.914,40.651 ; v1(119.841,30.625) 121.399,32.183 124.103,32.183 126.636,29.65 L46.1@129.1,29.65 ; v1(120.2,39.8) v1(120.2,41) 120.2,46.165 120.5,46.465 v1(120.5,47.8) ; 108.2,38.53 108.2,39.3 108.6,39.7 110.705,39.7 110.8,39.795 ; 110.8,39.795 110.8,40.651 ; 110.8,40.651 C122.2@115.914,40.651 ; C122.2@115.914,40.651 115.975,40.712 C122.2@116.205,40.712 116.425,40.712 116.8,40.337 v1(116.8,39.5) v1(115.6,39.5) 115.6,40.337 C122.2@115.914,40.651
  Bottom Layer w0.2: v1(100.7,41.1) 100.75,41.15 100.75,42.95 v1(100.8,43)
  Bottom Layer w0.3: v1(115.6,39.5) v1(116.8,39.5) 119.701,39.5 119.9,39.5 v1(120.2,39.8) v1(120.2,41) ; 119.808,39.393 119.808,30.658 v1(119.841,30.625) ; v1(120.5,46.6) v1(120.5,56.2)
pads on no net: D1.2 D1.5 D1.6 D1.14 D1.15 D1.22 D1.35 D1.36 D1.38 D1.39 D1.40 D1.41 D1.42 D1.43 D1.44 D1.45 D1.50 D1.54 D1.56 DA3.18 DA21.2 DA21.4 DA21.6 DA21.8 DA21.9 DA21.12 DA21.17 DA21.18 DA21.19 DA22.4 DA23.2 DA23.4 DA23.5 DA23.6 DA23.9 DA23.10 DA23.17 DA23.18 DA23.19 DA27.18 DD1.7 DD1.9 DD1.10 DD1.13 K1.2 K1.3 K1.4 VD1.2 XP2.0 XP4.0 Z1.1 Z1.2 Z1.7 Z1.8

## Polygon pours and split planes (outlines as drawn)
no net on Top Solder "NONET_L01_P002" (solid): 86.1,43.1 ccw(c87.6,43.1) 89.1,43.1 89.1,65.1 ccw(c87.6,65.1) 86.1,65.1
no net on Top Solder "NONET_L01_P002" (solid): 75.9,43.1 ccw(c77.4,43.1) 78.9,43.1 78.9,65.1 ccw(c77.4,65.1) 75.9,65.1
no net on Top Solder "NONET_L01_P002" (solid): 66,43.1 ccw(c67.5,43.1) 69,43.1 69,65.1 ccw(c67.5,65.1) 66,65.1
no net on Top Solder "NONET_L01_P002" (solid): 56,43.1 ccw(c57.5,43.1) 59,43.1 59,65.1 ccw(c57.5,65.1) 56,65.1
no net on Top Solder "NONET_L01_P002" (solid): 46,43.1 ccw(c47.5,43.1) 49,43.1 49,65.1 ccw(c47.5,65.1) 46,65.1
no net on Top Solder "NONET_L01_P002" (solid): 36.4,43.1 ccw(c37.9,43.1) 39.4,43.1 39.4,65.1 ccw(c37.9,65.1) 36.4,65.1
no net on Top Solder "NONET_L01_P002" (solid): 26.6,43.1 ccw(c28.1,43.1) 29.6,43.1 29.6,65.1 ccw(c28.1,65.1) 26.6,65.1
no net on Top Solder "NONET_L01_P002" (solid): 16.9,43.1 ccw(c18.4,43.1) 19.9,43.1 19.9,65.1 ccw(c18.4,65.1) 16.9,65.1
no net on Bottom Solder "NONET_L01_P002" (solid): 16.9,43.1 ccw(c18.4,43.1) 19.9,43.1 19.9,69.375 ccw(c18.4,69.375) 16.9,69.375
no net on Bottom Solder "NONET_L01_P002" (solid): 26.6,43.1 ccw(c28.1,43.1) 29.6,43.1 29.6,69 ccw(c28.1,69) 26.6,69
no net on Bottom Solder "NONET_L01_P002" (solid): 36.4,43.1 ccw(c37.9,43.1) 39.4,43.1 39.4,69.325 ccw(c37.9,69.325) 36.4,69.325
no net on Bottom Solder "NONET_L01_P002" (solid): 46,43.1 ccw(c47.5,43.1) 49,43.1 49,69.225 ccw(c47.5,69.225) 46,69.225
no net on Bottom Solder "NONET_L01_P002" (solid): 56,43.1 ccw(c57.5,43.1) 59,43.1 59,69.625 ccw(c57.5,69.625) 56,69.625
no net on Bottom Solder "NONET_L01_P002" (solid): 66,43.1 ccw(c67.5,43.1) 69,43.1 69,69.5 ccw(c67.5,69.5) 66,69.5
no net on Bottom Solder "NONET_L01_P002" (solid): 75.9,43.1 ccw(c77.4,43.1) 78.9,43.1 78.9,69.4 ccw(c77.4,69.4) 75.9,69.4
no net on Bottom Solder "NONET_L01_P002" (solid): 86.1,43.1 ccw(c87.6,43.1) 89.1,43.1 89.1,69.4 ccw(c87.6,69.4) 86.1,69.4
GND on Bottom Layer "GND_L02_P000" (solid, remove dead copper, pour order 0): -0.05,72.101 203.05,72 203.05,-0.05 -0.05,0.045
GND on Top Layer "GND_L01_P003" (solid, remove dead copper, pour order 3): -0.125,72.075 202.999,72.075 202.999,0.045 -0.065,0.045

## Keep-outs
Top Layer:
  rectangle: 155.067,8.382 166.497,24.384
  rectangle: 154.94,44.704 166.37,60.706
Keep-Out Layer:
  lines w0.1: 183,71.981 183,45 ccw(c185,45) 185,43 202.946,43 ; 183,72 0,72 0,34.5 0,0 203,0 203,43 ; 154.9,45.4 ccw(c155.9,45.4) 155.9,44.4 165.4,44.4 ccw(c165.4,45.4) 166.4,45.4 166.4,60.1 ccw(c165.4,60.1) 165.4,61.1 155.9,61.1 ccw(c155.9,60.1) 154.9,60.1 154.9,45.4 ; 155,9.1 ccw(c156,9.1) 156,8.1 165.5,8.1 ccw(c165.5,9.1) 166.5,9.1 166.5,23.8 ccw(c165.5,23.8) 165.5,24.8 156,24.8 ccw(c156,23.8) 155,23.8 155,9.1

## Other copper
Top Layer:
  rectangle net VDD_3V3: 53.9,7.4 55.9,8.3
  rectangle net VDD_12V: 99.675,28.35 100.925,31.225
  rectangle net VDD_12V: 99.675,22.05 100.925,24.925
  rectangle net NetC129_1: 103.639,44.836 106.639,47.221
  rectangle net NetC133_2: 103.5,57.5 106.5,59.885
  pour cut-out: 69.252,60.5 75.775,60.5 75.775,47.3 69.227,47.3
  pour cut-out: 29.727,60.5 36.25,60.5 36.25,47.3 29.701,47.3
  pour cut-out: 20.027,60.5 26.55,60.5 26.55,47.3 20.001,47.3
  pour cut-out: 79.403,60.5 85.925,60.5 85.925,47.3 79.377,47.3
  pour cut-out: 59.277,60.5 65.8,60.5 65.8,47.3 59.251,47.3
  pour cut-out: 49.402,60.5 55.925,60.5 55.925,47.3 49.376,47.3
  pour cut-out: 39.502,60.5 46.025,60.5 46.025,47.3 39.476,47.3
  pour cut-out: 10.439,60.55 16.825,60.55 16.825,46.475 10.411,46.475
  pour cut-out: 3.913,59.8 8.6,59.8 8.6,46.365 3.887,46.365
Bottom Layer:
  rectangle net NetC154_2: 167.996,31.8 172.1,33.8
  rectangle net VDD_3V3: 53.9,7.4 55.9,8.3
  rectangle net VDD_12V: 99.65,28.35 100.9,31.225
  rectangle net VDD_12V: 99.675,22.05 100.925,24.925
  rectangle net NetC133_2: 103,56.864 106.96,61.064
  rectangle net NetC129_1: 103,44.2 107.1,48.4
  pour cut-out: 39.452,60.5 45.975,60.5 45.975,47.3 39.426,47.3
  pour cut-out: 29.727,60.5 36.25,60.5 36.25,47.3 29.701,47.3
  pour cut-out: 79.403,60.5 85.925,60.5 85.925,47.3 79.377,47.3
  pour cut-out: 69.252,60.5 75.775,60.5 75.775,47.3 69.227,47.3
  pour cut-out: 59.277,60.5 65.8,60.5 65.8,47.3 59.252,47.3
  pour cut-out: 49.402,60.5 55.925,60.5 55.925,47.3 49.376,47.3
  pour cut-out: 20.027,60.5 26.55,60.5 26.55,47.3 20.001,47.3
  pour cut-out: 10.439,60.55 16.825,60.55 16.825,46.475 10.411,46.475
  pour cut-out: 3.913,59.8 8.6,59.8 8.6,46.365 3.887,46.365

## Silkscreen, mask and mechanical layers (free items; w line width, h text height)
Top Overlay:
  text "RX" at 177.354,66.754 h1.52
  text "TX" at 177.154,54.054 h1.52
  text "RX IN" at 1.604,31.179 h1.52
  text "TX IN" at 1.404,16.579 h1.52
  text "R2AWD v2.0" at 13.754,8.454 h1.52
  text "+12V" at 199.521,8.304 h1.52 r90
  text "2026" at 17.354,6.054 h1.52
Top Solder:
  lines w1: 0.5,1.5 0.5,37.4
  lines w3: 0.5,1.5 72.7,1.5 ; 1.4,37.5 1.4,70.5 172.1,70.5 ; 1.528,2.511 cw(c3,2.8) 4.483,2.572 ; 1.528,68.911 cw(c3,69.2) 2.243,67.905 ; 1.816,37.079 ccw(c3,38) 2.462,39.4 ; 30.528,2.511 cw(c32,2.8) 33.483,2.572 ; 32,2.8 32,6.9 ; 32,16.6 32,24 cw(c36.5,24) 36.5,28.5 41.7,28.5 ; 46.2,28.5 46.5,28.5 ; 55.204,28.496 67.679,28.496 ; 67.5,28.5 cw(c67.5,24) 72,24 ; 70.528,2.611 cw(c72,2.9) 71.1,1.7 ; 71.541,18.572 cw(c72,20) 72,18.5 ; 72,2.8 72,9.7 ; 72,2.9 72,5 ; 72,23.9 72,20 74.8,20 ; 80.5,20.1 97.9,20 ; 102.9,20 150.2,20 150.2,13.871 ; 121.517,69.428 ccw(c123,69.2) 124.472,69.489 ; 122.416,22.581 ccw(c123,21.2) 123.257,22.678 ; 123,21.2 123,29.9 ; 123,36.1 123,49.4 ; 123,56.2 123,69.2 ; 149.717,18.527 cw(c150,20) 150.609,18.629 ; 149.9,21.2 150.2,20.9 ; 150.2,7.874 150.2,1.5 183.36,1.5 ; 151.24,1.957 cw(c150,2.8) 151.483,2.572 ; 168.9,70.5 cw(c168.9,66.5) 172.9,66.5 ; 171.599,69.736 ccw(c173,69.2) 172.003,70.321 ; 172.875,41.825 173.1,41.6 ; 172.875,45.733 ccw(c176.875,45.733) 175.612,41.937 ; 172.9,59.1 172.9,41.5 175.6,41.5 ; 173,64.7 173,69.2 ; 180.3,1.6 ccw(c180.3,5.6) 184.3,5.6 ; 181.6,41.7 201.8,41.7 ; 182.828,2.511 cw(c184.3,2.8) 183.052,1.968 ; 184.3,2.8 184.3,6.6 ; 184.325,11.425 184.325,23.3 201.55,23.3 201.55,41.385 201.335,41.6 ; 184.325,19.346 cw(c188.325,19.346) 188.325,23.346 ; 197.55,23.325 ccw(c197.55,27.325) 201.55,27.325 ; 197.588,41.6 cw(c197.588,37.6) 201.588,37.6
Bottom Solder:
  lines w1: 0.5,1.5 0.5,37.4
  lines w3: 0.5,1.5 72.7,1.5 ; 1.4,37.5 1.4,70.5 172.1,70.5 ; 1.528,2.511 cw(c3,2.8) 4.483,2.572 ; 1.528,68.911 cw(c3,69.2) 2.243,67.905 ; 1.816,37.079 ccw(c3,38) 2.462,39.4 ; 30.528,2.511 cw(c32,2.8) 33.483,2.572 ; 32,2.8 32,23.9 ; 32,24 cw(c36.5,24) 36.5,28.5 67.5,28.5 cw(c67.5,24) 72,24 ; 70.528,2.611 cw(c72,2.9) 71.1,1.7 ; 71.541,18.572 cw(c72,20) 72,18.5 ; 72,2.9 72,20 ; 72,23.9 72,20 ; 121.517,69.428 ccw(c123,69.2) 124.472,69.489 ; 122.416,22.581 ccw(c123,21.2) 123.257,22.678 ; 122.978,21.575 122.978,69.575 ; 149.717,18.527 cw(c150,20) 150.609,18.629 ; 149.9,21.2 150.2,20.9 150.2,2.8 ; 150,20 72,20 ; 150.2,1.5 183.36,1.5 ; 151.24,1.957 cw(c150,2.8) 151.483,2.572 ; 168.9,70.5 cw(c168.9,66.5) 172.9,66.5 ; 171.599,69.736 ccw(c173,69.2) 172.003,70.321 ; 172.875,41.825 173.1,41.6 ; 172.9,41.811 172.9,70.386 ; 172.9,45.719 ccw(c176.9,45.719) 176.9,41.719 ; 173.125,41.586 201.36,41.586 ; 180.3,1.6 ccw(c180.3,5.6) 184.3,5.6 ; 182.828,2.511 cw(c184.3,2.8) 183.052,1.968 ; 184.325,19.346 cw(c188.325,19.346) 188.325,23.346 ; 184.35,1.561 184.35,23.286 201.575,23.286 ; 197.575,23.311 ccw(c197.575,27.311) 201.575,27.311 ; 197.613,41.586 cw(c197.613,37.586) 201.613,37.586 ; 201.335,41.6 201.55,41.385 201.55,23.3
Экран:
  lines w0.2: 1,4.97 1,33.1 cw(c3,33.1) 3,35.1 ; 1.094,4.97 cw(c2.8,2.6) 5.694,2.986 ; 2.794,35.08 ccw(c2.8,38) 4.126,40.602 ; 3,42.291 3,64.8 cw(c5,64.8) 4.155,66.613 ; 3,42.4 ccw(c5,42.4) 4.155,40.587 ; 4.171,66.622 ccw(c2.8,69.2) 5.402,67.874 ; 5.387,67.845 cw(c7.2,67) 7.2,69 92,69 118.5,69 ; 5.694,3 29,3 ; 29.086,2.994 cw(c32,2.8) 30.527,5.321 ; 30.466,0 74.662,0 ; 30.5,0 0,0 0,72 175.7,72 175.7,66.168 ; 30.5,5.368 30.5,25.5 cw(c35.5,25.5) 35.5,30.5 ; 33.5,6.25 ccw(c35.5,6.25) 33.968,4.964 ; 33.5,6.3 33.5,25.5 cw(c35.5,25.5) 35.5,27.5 ; 33.991,4.936 cw(c32,2.8) 34.587,4.154 ccw(c36.4,5) 36.4,3 67.677,3 ; 35.546,27.5 69.8,27.5 cw(c69.8,25.5) 71.8,25.5 71.8,24.4 cw(c69.8,24.4) 70.645,22.587 ccw(c72,20) 70.674,17.398 ; 35.546,30.5 69.8,30.5 cw(c69.8,25.5) 74.8,25.5 74.8,23.5 ccw(c76.8,23.5) 76.8,21.5 ; 67.6,3 ccw(c67.6,5) 69.413,4.155 ; 69.398,4.126 cw(c72,2.8) 70.629,5.378 ; 70.645,5.387 ccw(c69.8,7.2) 71.8,7.2 71.8,15.6 ccw(c69.8,15.6) 70.645,17.413 ; 74.8,0 74.8,16.51 ; 74.8,16.5 cw(c76.8,16.5) 76.8,18.5 ; 76.821,18.5 145.161,18.5 ; 76.821,21.5 118.364,21.5 ; 104.648,0 104.8,0 ; 118.491,21.503 ccw(c118.491,24.503) 121.491,24.503 ; 118.6,69 cw(c118.6,67) 120.413,67.845 ; 120.422,67.829 ccw(c123,69.2) 121.025,67.049 ; 121.023,67.047 cw(c119.5,65.75) 121.5,65.706 121.5,24.503 ; 124.5,24.503 124.5,65.75 ; 124.5,65.75 cw(c126.5,65.75) 125.162,67.237 ; 124.508,24.503 ccw(c127.508,24.503) 127.508,21.503 ; 125.162,67.237 ccw(c123,69.2) 125.602,67.874 ; 125.587,67.845 cw(c127.4,67) 127.4,69 ; 127.5,69 157.4,69 168.35,69 cw(c168.35,66) 171.35,66 171.35,40.075 ; 127.508,21.5 146.812,21.5 ; 145.2,18.5 cw(c145.2,16.5) 147.2,16.5 ; 146.59,21.5 ccw(c146.59,23.5) 147.737,21.862 ; 147.205,16.5 147.205,0 186.9,0 186.9,3.543 ; 147.77,21.885 cw(c150,20) 152.082,17.952 ; 151.326,5.402 cw(c150,2.8) 152.578,4.171 ; 151.355,5.387 cw(c152.2,7.2) 150.2,7.2 150.2,15.6 cw(c152.2,15.6) 151.355,17.413 ; 151.371,17.422 ccw(c150,20) 152.602,18.674 ; 152.587,4.155 ccw(c154.4,5) 154.4,3 179.675,3 ccw(c179.675,6) 182.675,6 182.675,24.8 197.05,24.8 ccw(c197.05,27.8) 200.05,27.8 200.05,37.02 ; 171.35,40.025 197.066,40.025 ; 175.564,66.168 ccw(c176.198,64.427) 174.345,64.427 174.35,46.025 ccw(c177.35,46.025) 177.35,43.025 203.05,43.025 203.05,21.8 ; 186.954,3.543 cw(c188.673,5.997) 185.676,5.997 185.675,18.8 cw(c188.675,18.8) 188.675,21.8 203,21.8 ; 197.066,40.02 cw(c197.066,37.02) 200.066,37.02 ; 16.915,43.045 ccw(c18.415,43.045) 19.915,43.045 19.915,65.045 ccw(c18.415,65.045) 16.915,65.045 16.915,43.045 ; 26.694,42.918 ccw(c28.194,42.918) 29.694,42.918 29.694,64.918 ccw(c28.194,64.918) 26.694,64.918 26.694,42.918 ; 36.346,43.045 ccw(c37.846,43.045) 39.346,43.045 39.346,65.045 ccw(c37.846,65.045) 36.346,65.045 36.346,43.045 ; 46.125,43.18 ccw(c47.625,43.18) 49.125,43.18 49.125,65.18 ccw(c47.625,65.18) 46.125,65.18 46.125,43.18 ; 56.031,43.18 ccw(c57.531,43.18) 59.031,43.18 59.031,65.18 ccw(c57.531,65.18) 56.031,65.18 56.031,43.18 ; 66.064,43.307 ccw(c67.564,43.307) 69.064,43.307 69.064,65.307 ccw(c67.564,65.307) 66.064,65.307 66.064,43.307 ; 75.97,43.18 ccw(c77.47,43.18) 78.97,43.18 78.97,65.18 ccw(c77.47,65.18) 75.97,65.18 75.97,43.18 ; 86.13,43.18 ccw(c87.63,43.18) 89.13,43.18 89.13,65.18 ccw(c87.63,65.18) 86.13,65.18 86.13,43.18 ; 89.662,0 89.662,0